# Altium PCB DRIVER.PcbDoc (part 1 of 5)
Units mm, origin at the board's own origin, x right, y up, seen from the top; angles counter-clockwise.
Board outline 130 x 51 mm, 4 copper layers (SIG, GND_SIG, PWR, GND_PWR), stack 1.544 mm thick; 199 components, 147 nets, 682 pads, 359 vias.
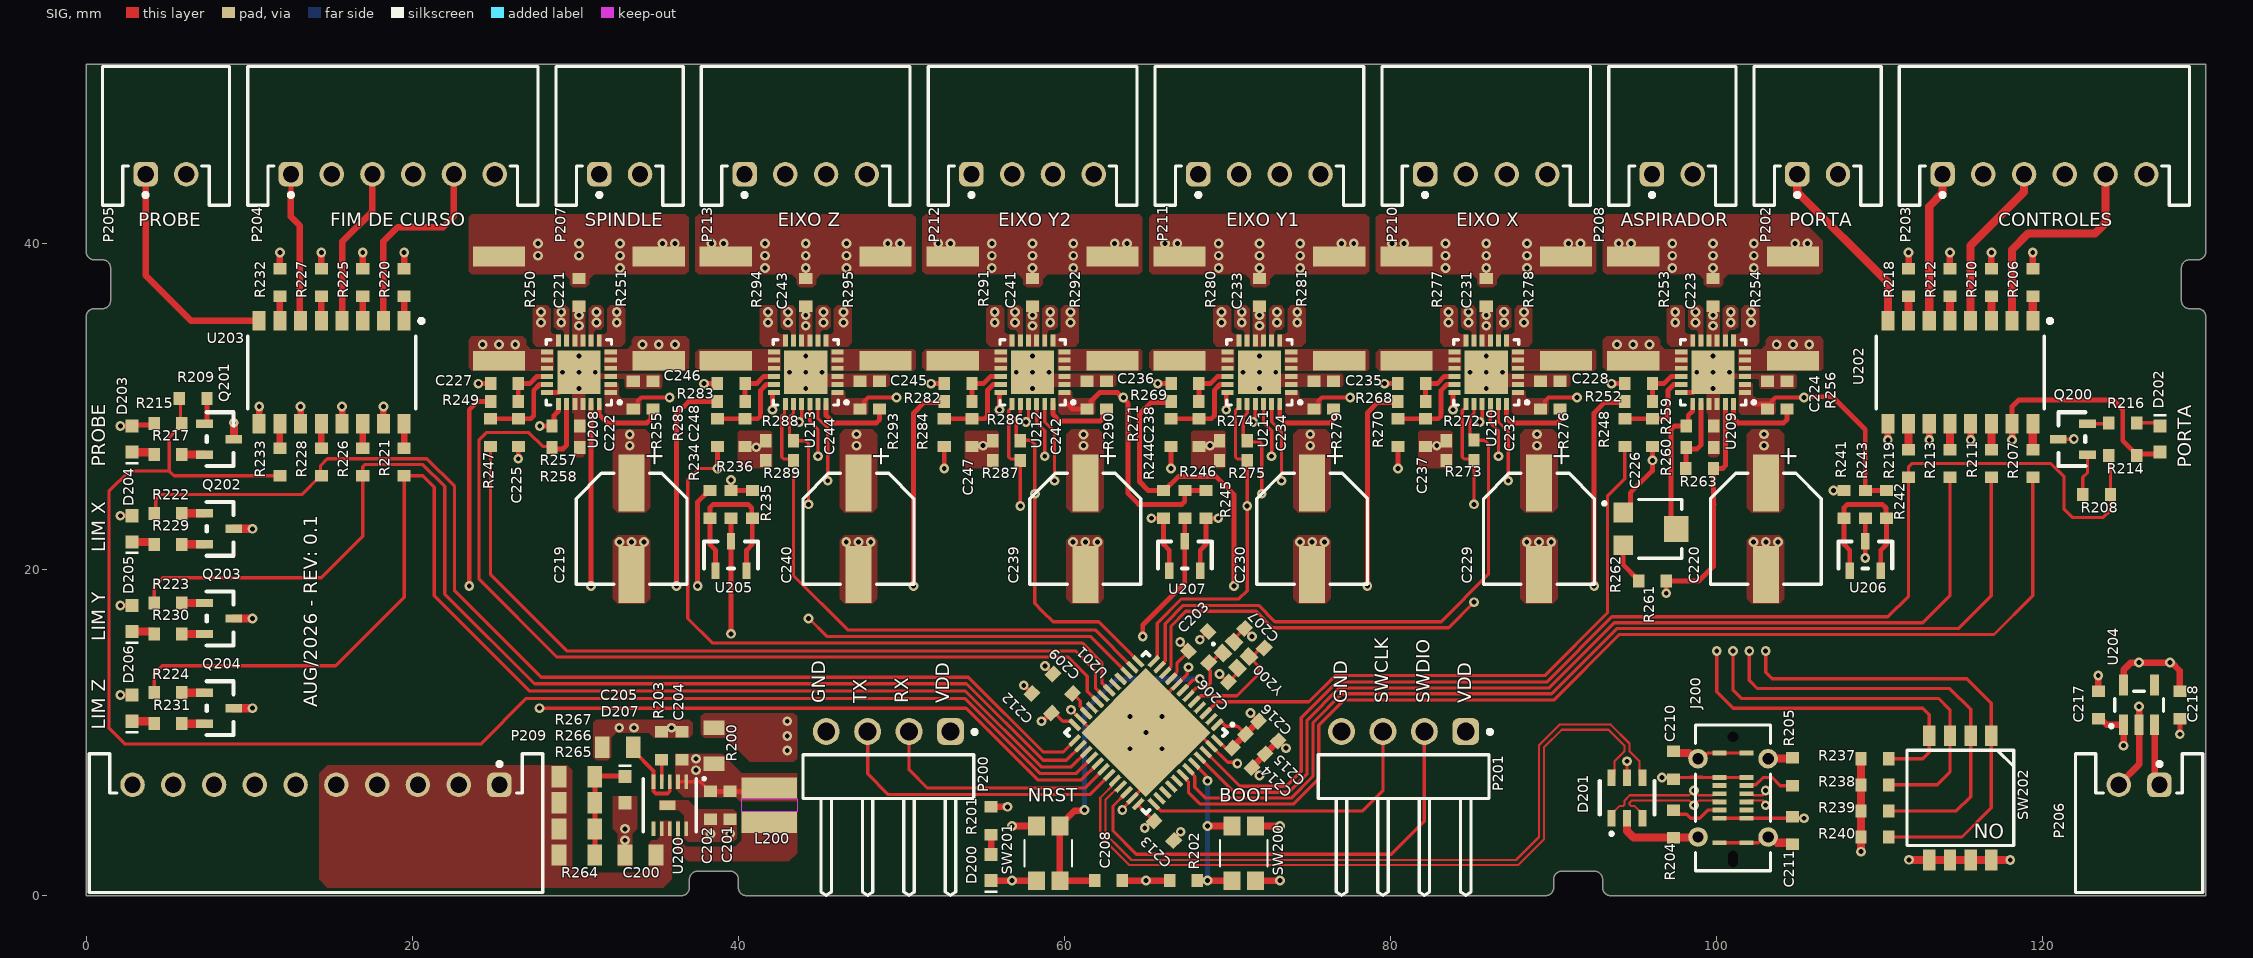
[diagram p0: SIG view]
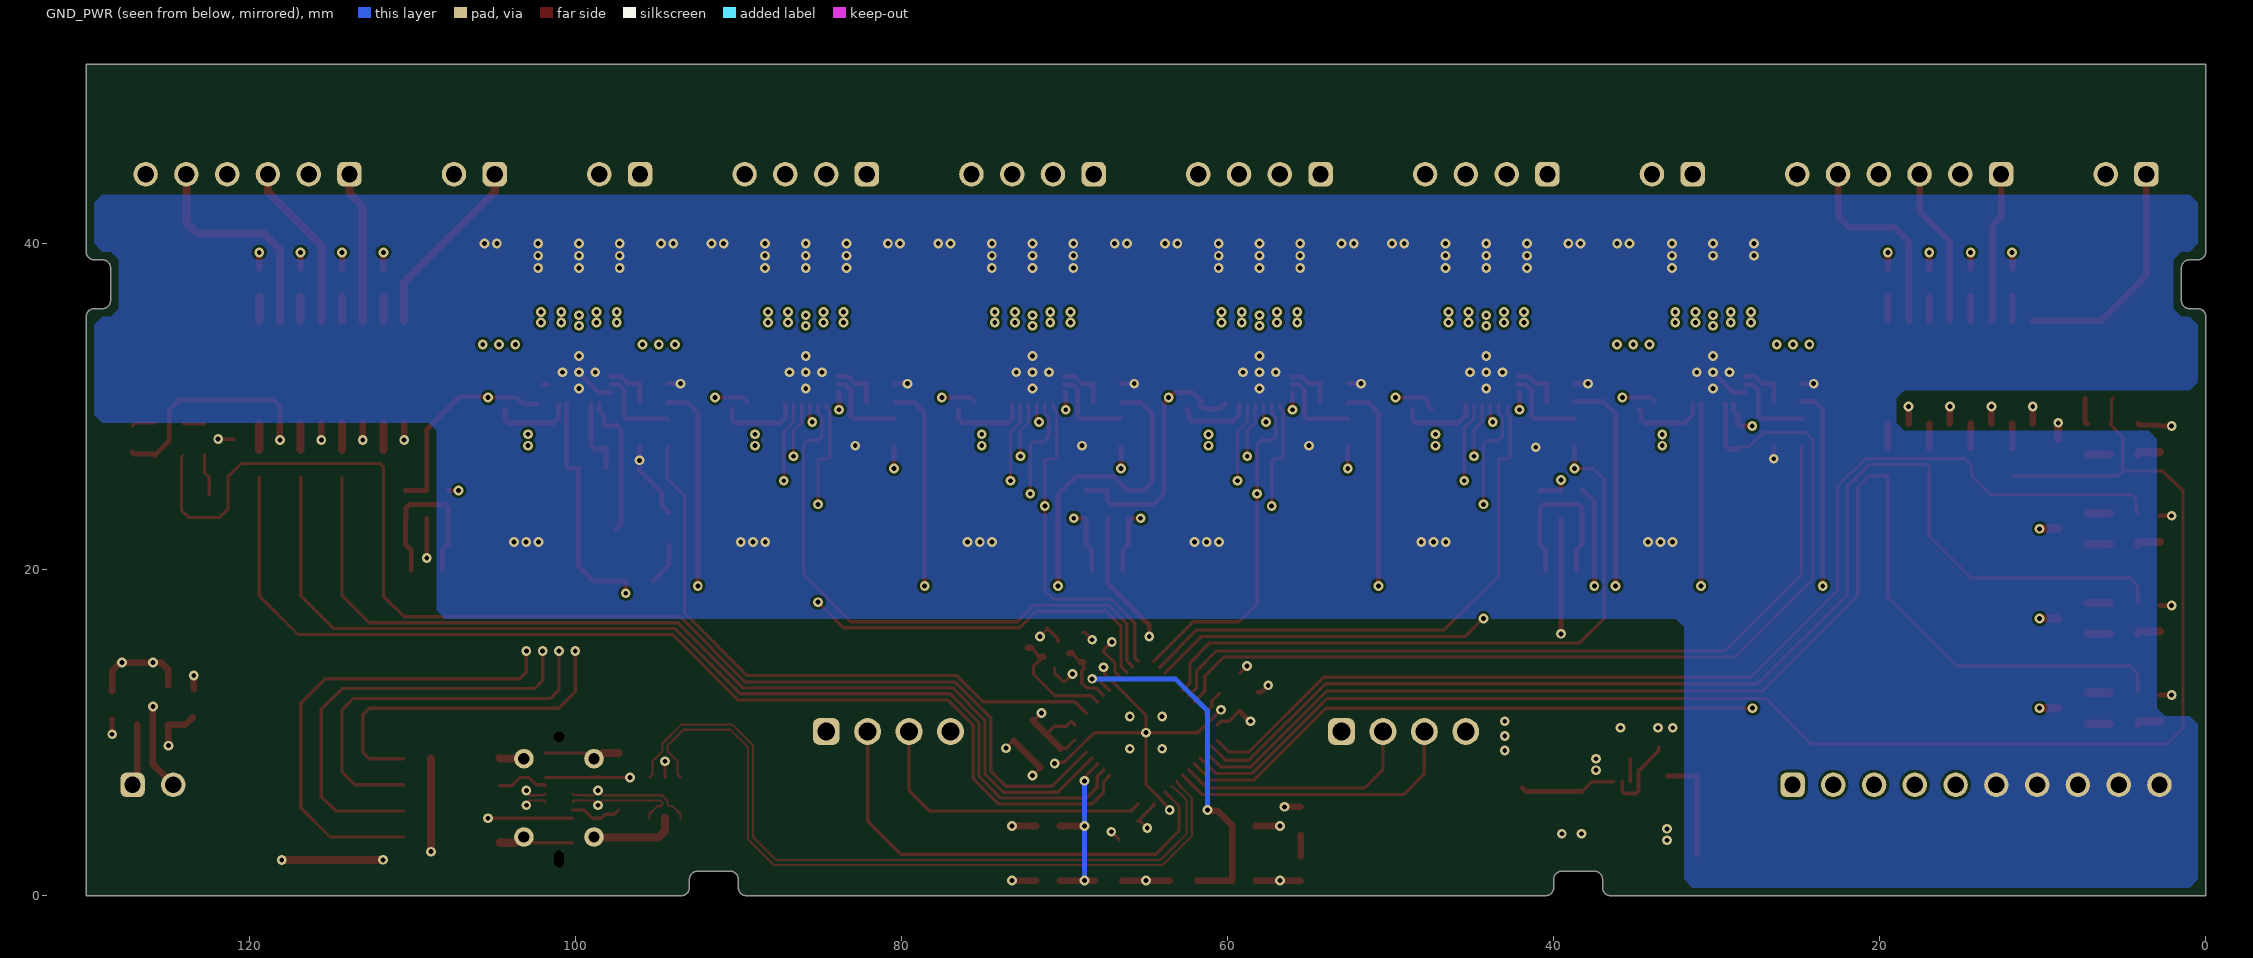
[diagram p1: GND_PWR view, seen from below]
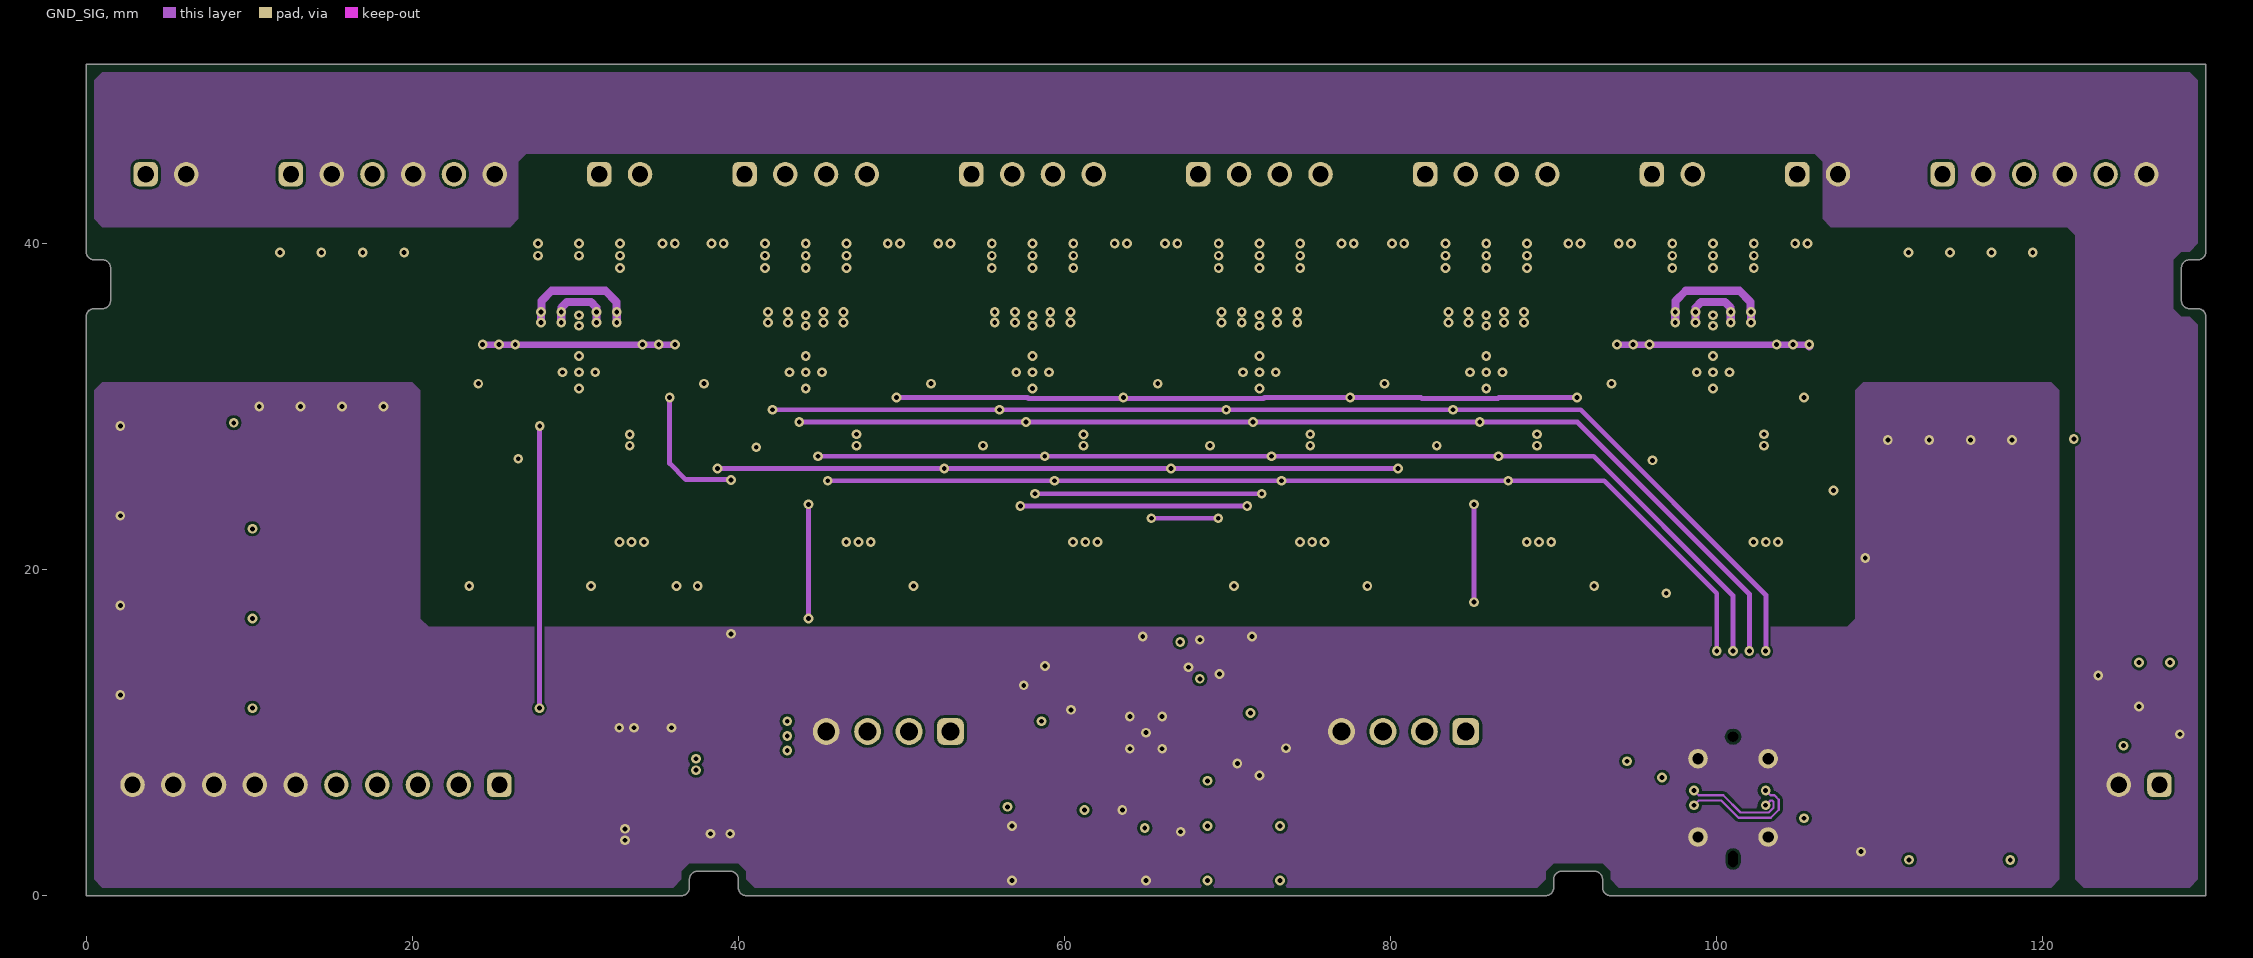
[diagram p2: GND_SIG]
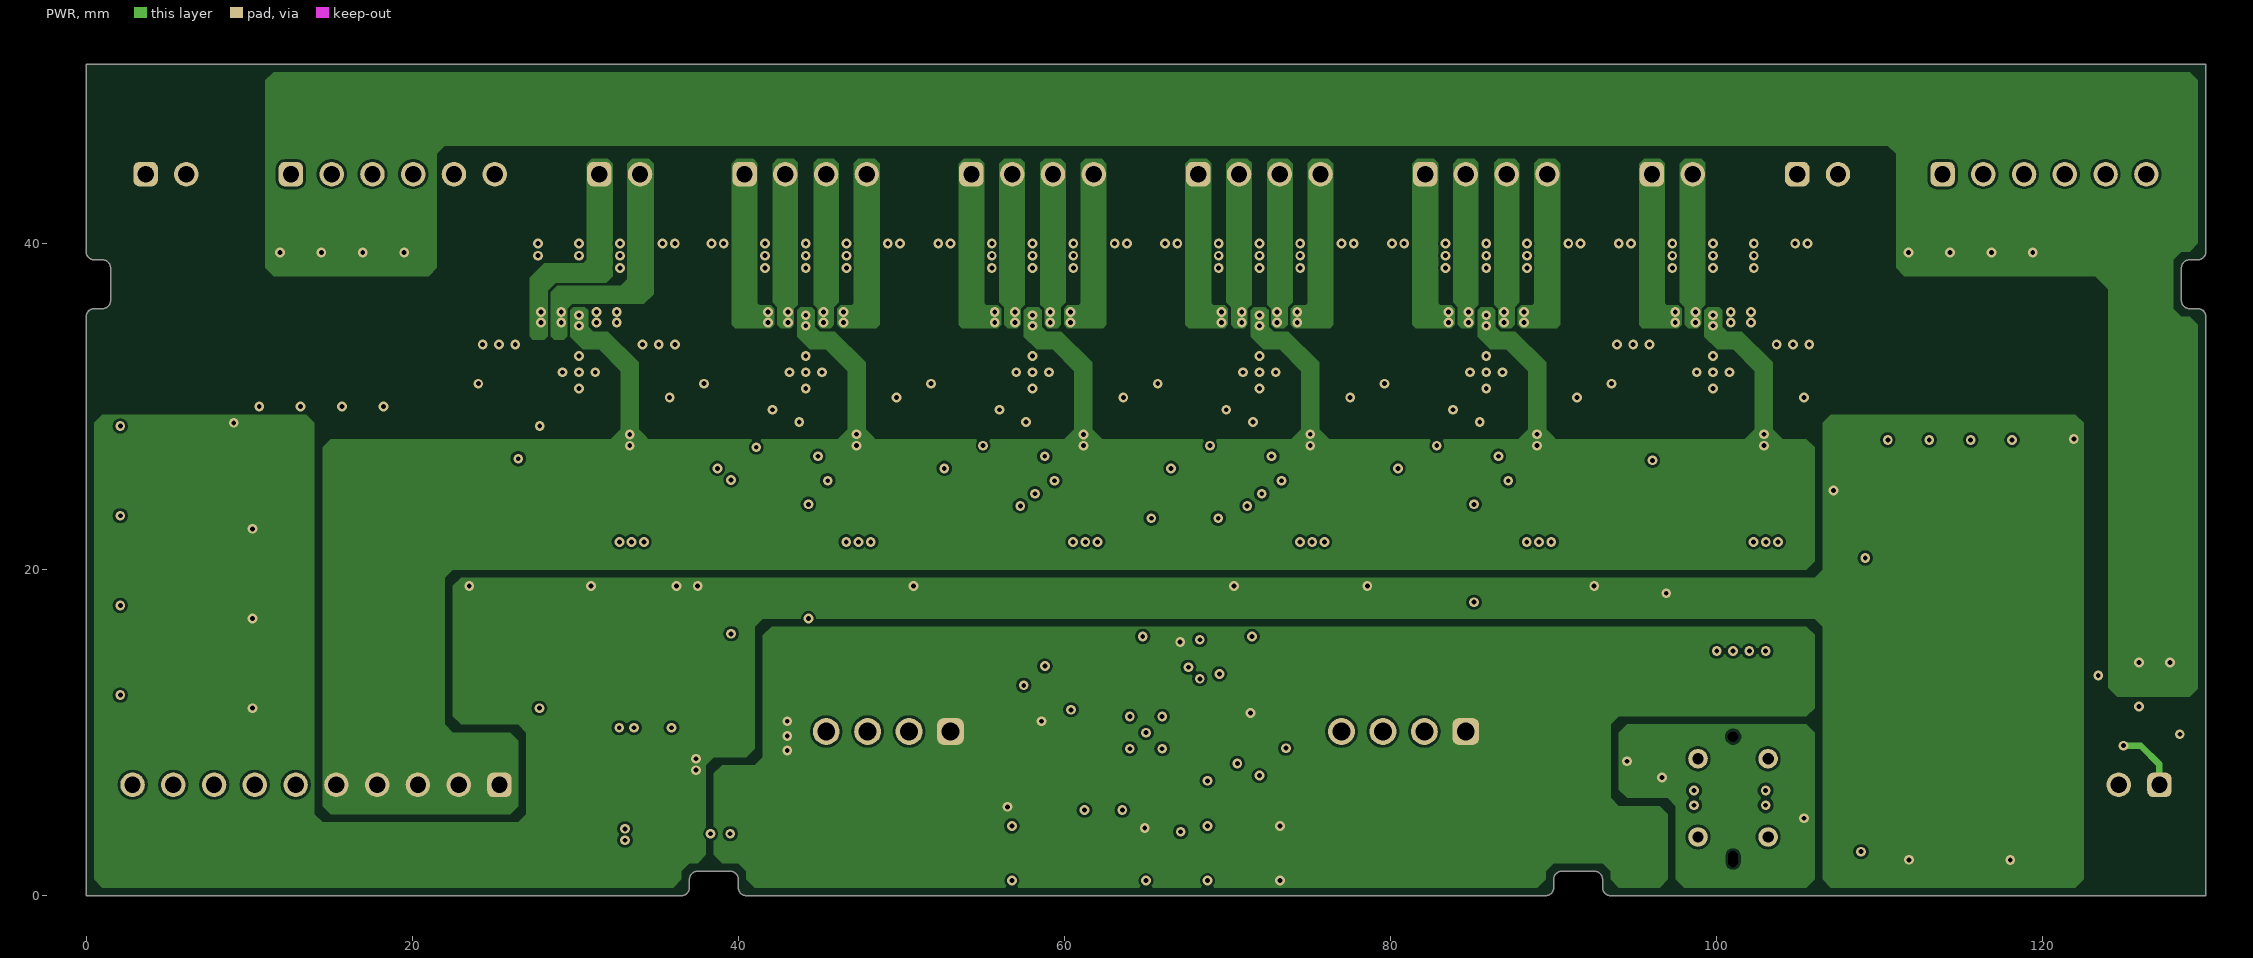
[diagram p3: PWR]
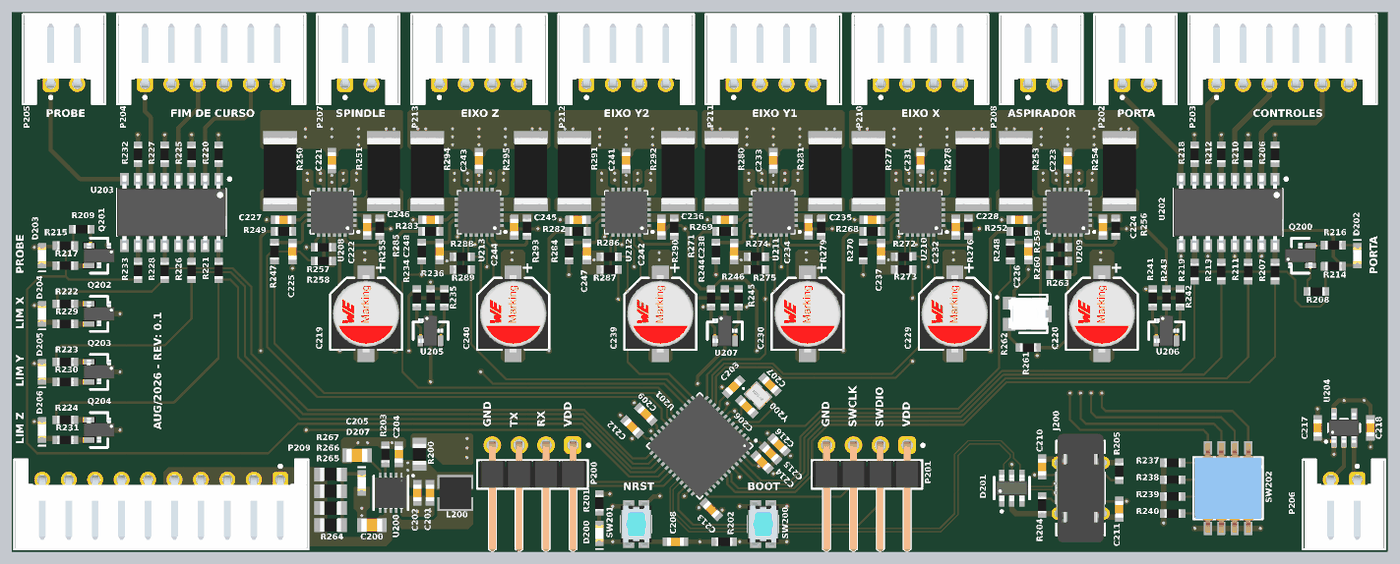
[diagram p6: 3D render of the assembled board from above, using the file's embedded part models]

## Layer stack, top to bottom
Top Solder: solder mask 0.01, Solder Resist, Dk 3.5
SIG: signal copper 0.035
Dielectric 2: prepreg 0.092, PP-006, Dk 4.1
GND_SIG: signal copper 0.03
Dielectric 1: dielectric 1.23, FR-4, Dk 4.8
PWR: signal copper 0.03
Dielectric 3: prepreg 0.092, PP-006, Dk 4.1
GND_PWR: signal copper 0.035
Bottom Solder: solder mask 0.01, Solder Resist, Dk 3.5

## Board outline
0,0 36.5,0 ccw(c36.5,0.5) 37,0.5 37,1 cw(c37.5,1) 37.5,1.5 39.5,1.5 cw(c39.5,1) 40,1 40,0.5 ccw(c40.5,0.5) 40.5,0 89.5,0 ccw(c89.5,0.5) 90,0.5 90,1 cw(c90.5,1) 90.5,1.5 92.5,1.5 cw(c92.5,1) 93,1 93,0.5 ccw(c93.5,0.5) 93.5,0 130,0 130,35.5 ccw(c129.5,35.5) 129.5,36 129,36 cw(c129,36.5) 128.5,36.5 128.5,38.5 cw(c129,38.5) 129,39 129.5,39 ccw(c129.5,39.5) 130,39.5 130,51 0,51 0,39.5 ccw(c0.5,39.5) 0.5,39 1,39 cw(c1,38.5) 1.5,38.5 1.5,36.5 cw(c1,36.5) 1,36 0.5,36 ccw(c0.5,35.5) 0,35.5

## Design rules (kind name [scope] priority, off if disabled: settings)
Clearance Clearance_DIFF90 [InNetClass('Diff. Pair')] p1: gap=0.178 ignorepadtopadclearanceinfootprint=FALSE
Clearance [All] p2: gap=0.16 ignorepadtopadclearanceinfootprint=FALSE
DiffPairsRouting DIFF90 [InDifferentialPairClass('DIFF90')] p1: maxlimit=0.178 minlimit=0.178 mostfreqgap=0.178 toplayer_minwidth=0.136 toplayer_maxwidth=0.136 toplayer_prefwidth=0.136 midlayer1_minwidth=0.136 midlayer1_maxwidth=0.136 midlayer1_prefwidth=0.136 midlayer2_minwidth=0.136 midlayer2_maxwidth=0.136 midlayer2_prefwidth=0.136 bottomlayer_minwidth=0.136 bottomlayer_maxwidth=0.136 bottomlayer_prefwidth=0.136 maxuncoupledlength=12.7
DiffPairsRouting [All] p2: maxlimit=0.254 minlimit=0.254 mostfreqgap=0.254 toplayer_minwidth=0.381 toplayer_maxwidth=0.381 toplayer_prefwidth=0.381 midlayer1_minwidth=0.381 midlayer1_maxwidth=0.381 midlayer1_prefwidth=0.381 midlayer2_minwidth=0.381 midlayer2_maxwidth=0.381 midlayer2_prefwidth=0.381 bottomlayer_minwidth=0.381 bottomlayer_maxwidth=0.381 bottomlayer_prefwidth=0.381 maxuncoupledlength=12.7
HoleSize [All] p1: absolutevalues=TRUE maxlimit=3 minlimit=0.025 maxpercent=80.000 minpercent=20.000
MinimumSolderMaskSliver [All] p1: minsoldermaskwidth=0.15
PolygonConnect [All] p1: connectstyle=Direct reliefconductorwidth=0.254 reliefentries=4 polygonreliefangle="90 Angle" airgapwidth=0.254
RoutingVias [All] p1: holewidth=0.3 width=0.6 viastyle="Through Hole" minholewidth=0.3 minwidth=0.6 maxholewidth=0.3 maxwidth=0.6
SilkToSolderMaskClearance [IsPad] p1: minsilkscreentomaskgap=0.15 clearancetoexposedcopper=TRUE
SolderMaskExpansion [All] p1: expansion=0 istentingtop=FALSE
SupplyNets "Schematic Supply Nets_12" [InNet('+VREF_SP')] p1: voltage=0.000
SupplyNets "Schematic Supply Nets_11" [InNet('+VREF_VAC')] p2: voltage=0.000
SupplyNets "Schematic Supply Nets_10" [InNet('+3V3')] p3: voltage=0.000
SupplyNets "Schematic Supply Nets_9" [InNet('GND_ISO')] p4: voltage=0.000
SupplyNets "Schematic Supply Nets_8" [InNet('+24V_PSU')] p5: voltage=0.000
SupplyNets "Schematic Supply Nets_6" [InNet('+3V3_ISO')] p6: voltage=0.000
SupplyNets "Schematic Supply Nets_5" [InNet('+VDD_MCU')] p7: voltage=0.000
SupplyNets "Schematic Supply Nets_4" [InNet('GND')] p8: voltage=0.000
SupplyNets "Schematic Supply Nets_3" [InNet('+VBUS')] p9: voltage=0.000
SupplyNets "Schematic Supply Nets_1" [InNet('+5V_ISO')] p10: voltage=0.000
SupplyNets "Schematic Supply Nets" [InNet('+VREF_STPR')] p11: voltage=0.000
Width Width_DIFF90 [InNetClass('Diff. Pair')] p1: maxlimit=0.136 minlimit=0.136 preferedwidth=0.136
Width [All] p2: maxlimit=1.27 minlimit=0.127 preferedwidth=0.254
26 further rules are at their usual default settings.

## Classes and differential pairs
net class "Diff. Pair": USBCON_N USBCON_P USBMIC_N USBMIC_P
differential pair class DIFF90: USBCON USBMIC
component class 5_MOTORES_DE_PASSO: C229 C230 C231 C232 C233 C234 C235 C236 C237 C238 C239 C240 C241 C242 C243 C244 C245 C246 C247 C248 HS202 HS203 HS204 HS205 P210 P211 P212 P213 R268 R269 R270 R271 R272 R273 R274 R275 R276 R277 R278 R279 R280 R281 R282 R283 R284 R285 R286 R287 R288 R289 R290 R291 R292 R293 R294 R295 U210 U211 U212 U213
component class 4_MOTORES_DC: C219 C220 C221 C222 C223 C224 C225 C226 C227 C228 D207 HS200 HS201 HS206 P207 P208 P209 R247 R248 R249 R250 R251 R252 R253 R254 R255 R256 R257 R258 R259 R260 R261 R262 R263 R264 R265 R266 R267 U208 U209
component class 3_INTERFACE_DOS_DRIVERS: R234 R235 R236 R237 R238 R239 R240 R241 R242 R243 R244 R245 R246 SW202 U205 U206 U207
component class 2_INTERFACES_EXTERNAS: C217 C218 D202 D203 D204 D205 D206 P202 P203 P204 P205 P206 Q200 Q201 Q202 Q203 Q204 R206 R207 R208 R209 R210 R211 R212 R213 R214 R215 R216 R217 R218 R219 R220 R221 R222 R223 R224 R225 R226 R227 R228 R229 R230 R231 R232 R233 U202 U203 U204
component class 1_MICROCONTROLADOR: C200 C201 C202 C203 C204 C205 C206 C207 C208 C209 C210 C211 C212 C213 C214 C215 C216 D200 D201 J200 L200 P200 P201 R200 R201 R202 R203 R204 R205 SW200 SW201 U200 U201 Y200
differential pair USBMIC: +USBMIC_P -USBMIC_N
differential pair USBCON: +USBCON_P -USBCON_N

## Components (designator, comment, footprint, x,y, rotation, side; value= is the part's Value field where it differs from the comment)
C200 "1μF, 50V" WCAP-CSGP_0805_L2W1.25H1.25 34,2.5 r0 top
C201 "2.2μF, 16V" WCAP-CSGP_0603_L1.6W0.8H0.8_Wave 39.5,5.548 r90 top
C202 "330nF, 16V" WCAP-CSGP_0603_L1.6W0.8H0.8_Wave 38.3,5.548 r90 top
C203 "100nF, 16V" WCAP-CSGP_0603_L1.6W0.8H0.8_Wave 68.2,15.6 r225 top
C204 "100nF, 16V" WCAP-CSGP_0603_L1.6W0.8H0.8_Wave 36.55,9.2 r270 top
C205 "470nF, 50V" WCAP-CSGP_0805_L2W1.25H1.25 32.6,9.1 r0 top
C206 "10pF, 16V" WCAP-CSGP_0603_L1.6W0.8H0.8_Wave 69.449,13.703 r135 top
C207 "10pF, 16V" WCAP-CSGP_0603_L1.6W0.8H0.8_Wave 71.649,15.794 r315 top
C208 "100nF, 16V" WCAP-CSGP_0603_L1.6W0.8H0.8_Wave 62.7,0.925 r180 top
C209 "2.2μF, 16V" WCAP-CSGP_0603_L1.6W0.8H0.8_Wave 59.9,13 r315 top
C210 "2.2μF, 16V" WCAP-CSGP_0603_L1.6W0.8H0.8_Wave 97.35,8 r270 top
C211 "2.2μF, 16V" WCAP-CSGP_0603_L1.6W0.8H0.8_Wave 104.65,4 r90 top
C212 "100nF, 16V" WCAP-CSGP_0603_L1.6W0.8H0.8_Wave 58.6,11.8 r315 top
C213 "100nF, 16V" WCAP-CSGP_0603_L1.6W0.8H0.8_Wave 66.1,3.975 r135 top
C214 "100nF, 16V" WCAP-CSGP_0603_L1.6W0.8H0.8_Wave 70.9,8.459 r135 top
C215 "100nF, 16V" WCAP-CSGP_0603_L1.6W0.8H0.8_Wave 71.7,9.3 r135 top
C216 "2.2μF, 16V" WCAP-CSGP_0603_L1.6W0.8H0.8_Wave 72.5,10.1 r135 top
C217 "1μF, 16V" WCAP-CSGP_0603_L1.6W0.8H0.8_Wave 123.4,11.7 r270 top
C218 "1μF, 16V" WCAP-CSGP_0603_L1.6W0.8H0.8_Wave 128.4,11.7 r90 top
C219 "47μF, 50V" WCAP-ASLI_D6.3H7.7 33.456,22.5 r90 top
C220 "47μF, 50V" WCAP-ASLI_D6.3H7.7 103.011,22.5 r90 top
C221 "330nF, 50V" WCAP-CSGP_0603_L1.6W0.8H0.8_Wave 30.222,37 r270 top
C222 "330nF, 16V" WCAP-CSGP_0603_L1.6W0.8H0.8_Wave 33.556,30.7 r270 top
C223 "330nF, 50V" WCAP-CSGP_0603_L1.6W0.8H0.8_Wave 99.777,37 r270 top
C224 "330nF, 16V" WCAP-CSGP_0603_L1.6W0.8H0.8_Wave 103.111,30.7 r270 top
C225 "10nF, 16V" WCAP-CSGP_0603_L1.6W0.8H0.8_Wave 26.506,28.4 r90 top
C226 "10nF, 16V" WCAP-CSGP_0603_L1.6W0.8H0.8_Wave 96.061,28.4 r90 top
C227 "1nF, 16V" WCAP-CSGP_0603_L1.6W0.8H0.8_Wave 25.656,31.4 r0 top
C228 "1nF, 16V" WCAP-CSGP_0603_L1.6W0.8H0.8_Wave 95.211,31.4 r0 top
C229 "47μF, 50V" WCAP-ASLI_D6.3H7.7 89.1,22.5 r90 top
C230 "47μF, 50V" WCAP-ASLI_D6.3H7.7 75.189,22.5 r90 top
C231 "330nF, 50V" WCAP-CSGP_0603_L1.6W0.8H0.8_Wave 85.866,37 r270 top
C232 "330nF, 16V" WCAP-CSGP_0603_L1.6W0.8H0.8_Wave 89.2,30.7 r270 top
C233 "330nF, 50V" WCAP-CSGP_0603_L1.6W0.8H0.8_Wave 71.955,37 r270 top
C234 "330nF, 16V" WCAP-CSGP_0603_L1.6W0.8H0.8_Wave 75.289,30.7 r270 top
C235 "1nF, 16V" WCAP-CSGP_0603_L1.6W0.8H0.8_Wave 81.3,31.4 r0 top
C236 "1nF, 16V" WCAP-CSGP_0603_L1.6W0.8H0.8_Wave 67.389,31.4 r0 top
C237 "10nF, 16V" WCAP-CSGP_0603_L1.6W0.8H0.8_Wave 82.15,28.4 r90 top
C238 "10nF, 16V" WCAP-CSGP_0603_L1.6W0.8H0.8_Wave 68.239,28.4 r90 top
C239 "47μF, 50V" WCAP-ASLI_D6.3H7.7 61.278,22.5 r90 top
C240 "47μF, 50V" WCAP-ASLI_D6.3H7.7 47.367,22.5 r90 top
C241 "330nF, 50V" WCAP-CSGP_0603_L1.6W0.8H0.8_Wave 58.044,37 r270 top
C242 "330nF, 16V" WCAP-CSGP_0603_L1.6W0.8H0.8_Wave 61.378,30.7 r270 top
C243 "330nF, 50V" WCAP-CSGP_0603_L1.6W0.8H0.8_Wave 44.133,37 r270 top
C244 "330nF, 16V" WCAP-CSGP_0603_L1.6W0.8H0.8_Wave 47.467,30.7 r270 top
C245 "1nF, 16V" WCAP-CSGP_0603_L1.6W0.8H0.8_Wave 53.478,31.4 r0 top
C246 "1nF, 16V" WCAP-CSGP_0603_L1.6W0.8H0.8_Wave 39.567,31.4 r0 top
C247 "10nF, 16V" WCAP-CSGP_0603_L1.6W0.8H0.8_Wave 54.328,28.4 r90 top
C248 "10nF, 16V" WCAP-CSGP_0603_L1.6W0.8H0.8_Wave 40.417,28.4 r90 top
D200 "Bright Green, 2V, 140deg" WL-SMCW_0603_150060xx75000 55.5,1.725 r90 top
D201 "USBLC6-2SC6Y" SOT-23-6 94.5,6 r90 top value=2.5pF
D202 "Red, 2V, 140deg" WL-SMCW_0603_150060xx75003 127.174,28 r270 top
D203 "Red, 2V, 140deg" WL-SMCW_0603_150060xx75003 2.826,28 r90 top
D204 "Red, 2V, 140deg" WL-SMCW_0603_150060xx75003 2.826,22.5 r90 top
D205 "Red, 2V, 140deg" WL-SMCW_0603_150060xx75003 2.826,17 r90 top
D206 "Red, 2V, 140deg" WL-SMCW_0603_150060xx75003 2.826,11.5 r90 top
D207 "Red, 2V, 140deg" WL-SMCW_0603_150060xx75003 33.05,6.5 r270 top
HS200 "10x10x7mm" HEATSINK_10MM_10MM_7MM 44.133,63 r0 top
HS201 "10x10x7mm" HEATSINK_10MM_10MM_7MM 58.044,63 r0 top
HS202 "10x10x7mm" HEATSINK_10MM_10MM_7MM 30.222,63 r0 top
HS203 "10x10x7mm" HEATSINK_10MM_10MM_7MM 71.955,63 r0 top
HS204 "10x10x7mm" HEATSINK_10MM_10MM_7MM 85.866,63 r0 top
HS205 "10x10x7mm" HEATSINK_10MM_10MM_7MM 99.777,63 r0 top
HS206 "70x21x4mm" HEATSINK_70MM_21MM_4MM 65,81 r180 top
J200 "629722050114" 629722050114 101,6 r270 top
L200 "47uH" WE-MAIA_3015 41.9,5.548 r90 top
P200 "61300411021" 61300411021 49.2,7.3 r0 top
P201 "61300411021" 61300411021 80.8,7.3 r0 top
P202 "68800211722" 68800211722 106.188,46.6 r180 top
P203 "68800611722" 68800611722 120.099,46.6 r180 top
P204 "68800611722" 68800611722 18.811,46.6 r180 top
P205 "68800211722" 68800211722 4.9,46.6 r180 top
P206 "68800211722" 68800211722 125.9,4.45 r0 top locked
P207 "68800211722" 68800211722 32.722,46.6 r180 top
P208 "68800211722" 68800211722 97.277,46.6 r180 top
P209 "68801011722" 68801011722 14.1,4.45 r0 top locked
P210 "68800411722" 68800411722 85.866,46.6 r180 top
P211 "68800411722" 68800411722 71.955,46.6 r180 top
P212 "68800411722" 68800411722 58.044,46.6 r180 top
P213 "68800411722" 68800411722 44.133,46.6 r180 top
Q200 "SBC817-40LT3G" SOT-23-3 121.774,28 r90 top
Q201 "SBC817-40LT3G" SOT-23-3 8.226,28 r270 top
Q202 "SBC817-40LT3G" SOT-23-3 8.226,22.5 r270 top
Q203 "SBC817-40LT3G" SOT-23-3 8.226,17 r270 top
Q204 "SBC817-40LT3G" SOT-23-3 8.226,11.5 r270 top
R200 "0Ω" 0805-WAVE 38.5,9.2 r90 top
R201 "200Ω" 0603-WAVE#1 55.5,4.6 r90 top
R202 "10kΩ" 0603-WAVE#1 67.3,0.925 r0 top
R203 "0Ω" 0603-WAVE#1 35.3,9.2 r90 top
R204 "5.11kΩ" 0603-WAVE#1 97.35,4.4 r90 top
R205 "5.11kΩ" 0603-WAVE#1 104.65,7.6 r270 top
R206 "205Ω" 0603-WAVE#1 119.383,37.6 r270 top
R207 "10kΩ" 0603-WAVE#1 119.383,26.5 r270 top
R208 "17.8kΩ" 0603-WAVE#1 123.3,24.6 r0 top
R209 "17.8kΩ" 0603-WAVE#1 6.568,30.5 r180 top
R210 "205Ω" 0603-WAVE#1 116.843,37.6 r270 top
R211 "10kΩ" 0603-WAVE#1 116.843,26.5 r270 top
R212 "205Ω" 0603-WAVE#1 114.303,37.6 r270 top
R213 "10kΩ" 0603-WAVE#1 114.303,26.5 r270 top
R214 "10kΩ" 0603-WAVE#1 124.9,27 r180 top
R215 "NM" 0603-WAVE#1 5.026,28.95 r0 top
R216 "205Ω" 0603-WAVE#1 124.9,29 r180 top
R217 "205Ω" 0603-WAVE#1 5.026,27.05 r0 top
R218 "205Ω" 0603-WAVE#1 111.763,37.6 r270 top
R219 "10kΩ" 0603-WAVE#1 111.763,26.5 r270 top
R220 "205Ω" 0603-WAVE#1 19.507,37.6 r270 top
R221 "10kΩ" 0603-WAVE#1 19.507,26.6 r270 top
R222 "17.8kΩ" 0603-WAVE#1 5.026,23.45 r180 top
R223 "17.8kΩ" 0603-WAVE#1 5.026,17.95 r180 top
R224 "17.8kΩ" 0603-WAVE#1 5.026,12.45 r180 top
R225 "205Ω" 0603-WAVE#1 16.967,37.6 r270 top
R226 "10kΩ" 0603-WAVE#1 16.967,26.6 r270 top
R227 "205Ω" 0603-WAVE#1 14.427,37.6 r270 top
R228 "10kΩ" 0603-WAVE#1 14.427,26.6 r270 top
R229 "205Ω" 0603-WAVE#1 5.026,21.55 r0 top
R230 "205Ω" 0603-WAVE#1 5.026,16.05 r0 top
R231 "205Ω" 0603-WAVE#1 5.026,10.55 r0 top
R232 "205Ω" 0603-WAVE#1 11.887,37.6 r270 top
R233 "10kΩ" 0603-WAVE#1 11.887,26.6 r270 top
R234 "100Ω" 0603-WAVE#1 38.256,24 r90 top
R235 "1.78kΩ" 0603-WAVE#1 40.856,24 r90 top
R236 "909Ω" 0603-WAVE#1 39.556,24 r270 top
R237 "10kΩ" 0603-WAVE#1 109.7,8.4 r0 top
R238 "10kΩ" 0603-WAVE#1 109.7,6.8 r0 top
R239 "10kΩ" 0603-WAVE#1 109.7,5.2 r0 top
R240 "10kΩ" 0603-WAVE#1 109.7,3.6 r0 top
R241 "100Ω" 0603-WAVE#1 107.811,24 r90 top
R242 "1.78kΩ" 0603-WAVE#1 110.411,24 r90 top
R243 "909Ω" 0603-WAVE#1 109.111,24 r270 top
R244 "100Ω" 0603-WAVE#1 66.078,24 r90 top
R245 "1.78kΩ" 0603-WAVE#1 68.678,24 r90 top
R246 "909Ω" 0603-WAVE#1 67.378,24 r270 top
R247 "39.2kΩ" 0603-WAVE#1 24.806,28.4 r270 top
R248 "39.2kΩ" 0603-WAVE#1 94.361,28.4 r270 top
R249 "18.2kΩ" 0603-WAVE#1 25.656,30.3 r180 top
R250 "0.2Ω, 1W" 2512-WAVE 25.322,36 r270 top value=200mΩ
R251 "0.2Ω, 1W" 2512-WAVE 35.122,36 r270 top value=200mΩ
R252 "18.2kΩ" 0603-WAVE#1 95.211,30.3 r180 top
R253 "0.2Ω, 1W" 2512-WAVE 94.877,36 r270 top value=200mΩ
R254 "0.2Ω, 1W" 2512-WAVE 104.677,36 r270 top value=200mΩ
R255 "39.2kΩ" 0603-WAVE#1 34.756,30.7 r270 top
R256 "39.2kΩ" 0603-WAVE#1 104.311,30.7 r270 top
R257 "47.5kΩ" 0603-WAVE#1 29.422,28.8 r180 top
R258 "47.5kΩ" 0603-WAVE#1 29.422,27.5 r180 top
R259 "47.5kΩ" 0603-WAVE#1 98.977,28.8 r180 top
R260 "47.5kΩ" 0603-WAVE#1 98.977,27.5 r180 top
R261 "1kΩ" 0603-WAVE#1 96.056,19.3 r180 top
R262 "10kΩ, 0.15W" TRIM-3P80MM_3P60MM 96.056,22.5 r0 top value=10kΩ
R263 "NM" 0603-WAVE#1 98.95,26.2 r180 top
R264 "8.87kΩ" 0805-WAVE 30.1,2.5 r180 top
R265 "8.87kΩ" 0805-WAVE 30.1,4.1 r180 top
R266 "8.87kΩ" 0805-WAVE 30.1,5.7 r180 top
R267 "8.87kΩ" 0805-WAVE 30.1,7.3 r180 top
R268 "1kΩ" 0603-WAVE#1 81.3,30.3 r180 top
R269 "1kΩ" 0603-WAVE#1 67.389,30.3 r180 top
R270 "10kΩ" 0603-WAVE#1 80.45,28.4 r270 top
R271 "10kΩ" 0603-WAVE#1 66.539,28.4 r270 top
R272 "47.5kΩ" 0603-WAVE#2 84.266,27.9 r0 top
R273 "47.5kΩ" 0603-WAVE#1 84.266,26.7 r0 top
R274 "47.5kΩ" 0603-WAVE#1 70.355,27.9 r0 top
R275 "47.5kΩ" 0603-WAVE#1 70.355,26.7 r0 top
R276 "22.1kΩ" 0603-WAVE#1 90.4,30.7 r270 top
R277 "0.2Ω, 1W" 2512-WAVE 80.966,36 r270 top value=200mΩ
R278 "0.2Ω, 1W" 2512-WAVE 90.766,36 r270 top value=200mΩ
R279 "22.1kΩ" 0603-WAVE#1 76.489,30.7 r270 top
R280 "0.2Ω, 1W" 2512-WAVE 67.055,36 r270 top value=200mΩ
R281 "0.2Ω, 1W" 2512-WAVE 76.855,36 r270 top value=200mΩ
R282 "1kΩ" 0603-WAVE#1 53.478,30.3 r180 top
R283 "1kΩ" 0603-WAVE#1 39.567,30.3 r180 top
R284 "10kΩ" 0603-WAVE#1 52.628,28.4 r270 top
R285 "10kΩ" 0603-WAVE#1 38.717,28.4 r270 top
R286 "47.5kΩ" 0603-WAVE#1 56.444,27.9 r0 top
R287 "47.5kΩ" 0603-WAVE#1 56.444,26.7 r0 top
R288 "47.5kΩ" 0603-WAVE#1 42.533,27.9 r0 top
R289 "47.5kΩ" 0603-WAVE#1 42.533,26.7 r0 top
R290 "22.1kΩ" 0603-WAVE#1 62.578,30.7 r270 top
R291 "0.2Ω, 1W" 2512-WAVE 53.144,36 r270 top value=200mΩ
R292 "0.2Ω, 1W" 2512-WAVE 62.944,36 r270 top value=200mΩ
R293 "22.1kΩ" 0603-WAVE#1 48.667,30.7 r270 top
R294 "0.2Ω, 1W" 2512-WAVE 39.233,36 r270 top value=200mΩ
R295 "0.2Ω, 1W" 2512-WAVE 49.033,36 r270 top value=200mΩ
SW200 "434153017835" 434153017835 71,2.6 r270 top
SW201 "434153017835" 434153017835 59,2.6 r90 top
SW202 "416131160804" 416131160804 114.938,6 r180 top
U200 "L7983PU33R" 10-WFDFN-EP 35.8,5.548 r270 top
U201 "STM32F411CEU6" UFQFN-48-7X7_EXPOSED_PAD 65,10 r225 top locked
U202 "TLP293-4" SO-16 114.938,32.1 r270 top
U203 "TLP293-4" SO-16 15.062,32.1 r270 top
U204 "LDK220M33R" SOT-23-5 125.9,11.7 r90 top
U205 "TS3431CILT" SOT-23-3 39.556,20.9 r0 top
U206 "TS3431CILT" SOT-23-3 109.111,20.9 r0 top
U207 "TS3431CILT" SOT-23-3 67.378,20.9 r0 top
U208 "STSPIN840" 24-TQFPN 30.222,32.1 r180 top
U209 "STSPIN840" 24-TQFPN 99.777,32.1 r180 top
U210 "STSPIN820" 24-TQFPN 85.866,32.1 r180 top
U211 "STSPIN820" 24-TQFPN 71.955,32.1 r180 top
U212 "STSPIN820" 24-TQFPN 58.044,32.1 r180 top
U213 "STSPIN820" 24-TQFPN 44.133,32.1 r180 top
Y200 "25MHz" WE-XTAL_IQXC-42 70.508,14.765 r315 top

## Footprints (in the part's own frame and the unit in brackets; to place one, negate y for a bottom-side part, rotate by r counter-clockwise, add the part's x,y. Pads: shape width x height; smd on the part's side, far side on the other; paste and mask are expansions set on the pad)
10-WFDFN-EP [mil]
  rect 35.43x9 smd paste+0 mask+0: 1(-57,39.37) 2(-57,19.68) 3(-57,0) 4(-57,-19.68) 5(-57,-39.37) 6(57,-39.37) 7(57,-19.68) 8(57,0) 9(57,19.68) 10(57,39.37)
  rect 24x39 smd paste+0 mask+0: 11(0,-5.91)
  silkscreen extent -67,-64 64,85, body extent -59,-59 59,59, height 30
24-TQFPN [mm]
  rect 0.75x0.3 smd mask+0: 1(-1.95,1.25) 2(-1.95,0.75) 3(-1.95,0.25) 4(-1.95,-0.25) 5(-1.95,-0.75) 6(-1.95,-1.25) 13(1.95,-1.25) 14(1.95,-0.75) 15(1.95,-0.25) 16(1.95,0.25) 17(1.95,0.75) 18(1.95,1.25)
  rect 0.3x0.75 smd mask+0: 7(-1.25,-1.95) 8(-0.75,-1.95) 9(-0.25,-1.95) 10(0.25,-1.95) 11(0.75,-1.95) 12(1.25,-1.95) 19(1.25,1.95) 20(0.75,1.95) 21(0.25,1.95) 22(-0.25,1.95) 23(-0.75,1.95) 24(-1.25,1.95)
  rect 2.65x2.65 smd paste-2539.97 mask+0: 25(0,0)
  silkscreen extent -2.59,-2 2,2, body extent -2,-2 2,2, height 1.1
0603-WAVE#1 [mm]
  rect 0.7x0.8 smd: 1(-0.85,0) 2(0.85,0)
  body extent -0.8,-0.4 0.8,0.4, height 0.45
0603-WAVE#2 [mm]
  rect 0.7x0.8 smd: 1(-0.85,0) 2(0.85,0.034)
  body extent -0.8,-0.4 0.8,0.4, height 0.45
0805-WAVE [mm]
  rect 0.9x1.3 smd: 1(-1.1,0) 2(1.1,0)
  body extent -1,-0.63 1,0.62, height 0.5
2512-WAVE [mm]
  rect 1.2x3.2 smd: 1(-3.2,0) 2(3.2,0)
  body extent -3.15,-1.55 3.15,1.55, height 0.55
61300411021 [mm] "Pin Header, pitch 2.54 mm, THT, Angled, single row, 4p"
  rrect50% 1.65x1.65 hole 1.1: 1(3.81,2.77)
  round 1.65 hole 1.1: 2(1.27,2.77) 3(-1.27,2.77) 4(-3.81,2.77)
  silkscreen extent -5.23,-7.27 5.42,2.87, body extent -5.08,-7.27 5.08,3.09, height 2.58
68800211722 [mm] "2.50mm ¡°J¡± Type Male Horizontal Shrouded Header, 2p"
  rrect50% 1.5x1.5 hole 1: 1(1.25,2.35)
  round 1.5 hole 1: 2(-1.25,2.35)
  silkscreen extent -3.9,-4.25 3.9,4.25, body extent -3.75,-4.15 3.75,4.15, height 4.23
68800411722 [mm] "2.50mm ¡°J¡± Type Male Horizontal Shrouded Header, 4p"
  rrect50% 1.5x1.5 hole 1: 1(3.75,2.35)
  round 1.5 hole 1: 2(1.25,2.35) 3(-1.25,2.35) 4(-3.75,2.35)
  silkscreen extent -6.4,-4.25 6.4,4.25, body extent -6.25,-4.15 6.25,4.15, height 4.23
68800611722 [mm] "2.50mm ¡°J¡± Type Male Horizontal Shrouded Header, 6p"
  rrect50% 1.5x1.5 hole 1: 1(6.25,2.35)
  round 1.5 hole 1: 2(3.75,2.35) 3(1.25,2.35) 4(-1.25,2.35) 5(-3.75,2.35) 6(-6.25,2.35)
  silkscreen extent -8.9,-4.25 8.9,4.25, body extent -8.75,-4.15 8.75,4.15, height 4.23
68801011722 [mm] "2.50mm ¡°J¡± Type Male Horizontal Shrouded Header, 10p"
  rrect50% 1.5x1.5 hole 1: 1(11.25,2.35)
  round 1.5 hole 1: 2(8.75,2.35) 3(6.25,2.35) 4(3.75,2.35) 5(1.25,2.35) 6(-1.25,2.35) 7(-3.75,2.35) 8(-6.25,2.35) 9(-8.75,2.35) 10(-11.25,2.35)
  silkscreen extent -13.9,-4.25 13.9,4.25, body extent -13.75,-4.15 13.75,4.15, height 4.23
416131160804 [mm] "SMD Dip Switch, Small Compact, Raised Actuator, 4pin"
  rect 0.76x1.27 smd: 1(-1.905,-3.81) 2(-0.635,-3.81) 3(0.635,-3.81) 4(1.905,-3.81) 5(1.905,3.81) 6(0.635,3.81) 7(-0.635,3.81) 8(-1.905,3.81)
  silkscreen extent -3.27,-2.93 3.27,2.93, body extent -3.12,-4.22 3.13,4.22, height 2.7
434153017835 [mm] "Tact Switch, SMD, body 3.5x2.9mm"
  rect 1.15x1.05 smd: 1(-1.675,0.725) 2(-1.675,-0.725) 3(1.675,0.725) 4(1.675,-0.725)
  silkscreen extent -0.8,-1.45 0.8,1.45, body extent -2.15,-1.45 2.15,1.45, height 1.7
629722050114 [mm]
  rect 0.3x0.85 smd: A1(-2.75,0.83) A4(-1.25,0.83) A5(-0.75,0.83) A6(-0.25,0.83) A7(0.25,0.83) A8(0.75,0.83) A9(1.25,0.83) A12(2.75,0.83) B1(2.75,-0.83) B4(1.25,-0.83) B5(0.75,-0.83) B6(0.25,-0.83) B7(-0.25,-0.83) B8(-0.75,-0.83) B9(-1.25,-0.83) B12(-2.75,-0.83)
  round 0.56 hole 0.66 unplated: MH1(-3.75,0)
  oval 0.9x0.48 hole 0.58 slot 1 at 0 deg unplated: MH2(3.75,0)
  round 1.2 hole 0.7: Shell(-2.4,2.15) Shell(-2.4,-2.15) Shell(2.4,2.15) Shell(2.4,-2.15)
  silkscreen extent -4.47,-2.3 4.47,2.3, body extent -5.15,-2.3 5.15,2.3, height 9.75
HEATSINK_10MM_10MM_7MM [mm]
  body extent -5,-5 5,5, height 8.2
HEATSINK_70MM_21MM_4MM [mm]
  body extent -35,-10.5 35,10.5, height 1.2
SO-16 [mm]
  rect 1.2x0.8 smd: 1(-3.15,4.445) 2(-3.15,3.175) 3(-3.15,1.905) 4(-3.15,0.635) 5(-3.15,-0.635) 6(-3.15,-1.905) 7(-3.15,-3.175) 8(-3.15,-4.445) 9(3.15,-4.445) 10(3.15,-3.175) 11(3.15,-1.905) 12(3.15,-0.635) 13(3.15,0.635) 14(3.15,1.905) 15(3.15,3.175) 16(3.15,4.445)
  silkscreen extent -3.28,-5.15 2.23,5.63, body extent -3.5,-5.15 3.5,5.15, height 2.3
SOT-23-3 [mil]
  rect 20x40 smd mask+3.94: 1(-37.4,-38) 2(37.4,-38) 3(0,32.75)
  silkscreen extent -65,-33 65,33, body extent -57,-47 57,47, height 44
SOT-23-5 [mil]
  rect 50x22 smd mask+1.97: 1(-48,37.5) 2(-48,0) 3(-48,-37.5) 4(48,-37.5) 5(48,37.5)
  silkscreen extent -55,-59 33,71, body extent -55,-57 55,57, height 57
SOT-23-6 [mil]
  rect 40x20 smd paste+0: 1(-49,37.4) 2(-49,0) 3(-49,-37.4) 4(49,-37.4) 5(49,0) 6(49,37.4)
  silkscreen extent -91,-66 41,66, body extent -49,-59 49,59, height 43
TRIM-3P80MM_3P60MM [mm]
  rect 1.2x1.2 smd: 1(-1.8,1) 3(-1.8,-1)
  rect 1.5x1.6 smd: 2(1.45,0)
  silkscreen extent -3.05,-1.8 1.8,1.8, body extent -1.9,-1.5 1.9,1.5, height 1.2
UFQFN-48-7X7_EXPOSED_PAD [mm]
  rrect25% 0.87x0.27 smd mask+0: 1(-3.43,2.75) 2(-3.43,2.25) 3(-3.43,1.75) 4(-3.43,1.25) 5(-3.43,0.75) 6(-3.43,0.25) 7(-3.43,-0.25) 8(-3.43,-0.75) 9(-3.43,-1.25) 10(-3.43,-1.75) 11(-3.43,-2.25) 12(-3.43,-2.75) 25(3.43,-2.75) 26(3.43,-2.25) 27(3.43,-1.75) 28(3.43,-1.25) 29(3.43,-0.75) 30(3.43,-0.25) 31(3.43,0.25) 32(3.43,0.75) 33(3.43,1.25) 34(3.43,1.75) 35(3.43,2.25) 36(3.43,2.75)
  rrect25% 0.27x0.87 smd mask+0: 13(-2.75,-3.43) 14(-2.25,-3.43) 15(-1.75,-3.43) 16(-1.25,-3.43) 17(-0.75,-3.43) 18(-0.25,-3.43) 19(0.25,-3.43) 20(0.75,-3.43) 21(1.25,-3.43) 22(1.75,-3.43) 23(2.25,-3.43) 24(2.75,-3.43) 37(2.75,3.43) 38(2.25,3.43) 39(1.75,3.43) 40(1.25,3.43) 41(0.75,3.43) 42(0.25,3.43) 43(-0.25,3.43) 44(-0.75,3.43) 45(-1.25,3.43) 46(-1.75,3.43) 47(-2.25,3.43) 48(-2.75,3.43)
  rect 5.6x5.6 smd paste-4 mask+0: 49(0,0)
  silkscreen extent -4.18,-3.5 3.5,3.5, body extent -3.5,-3.5 3.5,3.5, height 0.6
WCAP-ASLI_D6.3H7.7 [mm] "Aluminium Electrolytic V-Chip SMT Capacitors, 6.3x7.7mm"
  rect 3.5x1.6 smd: 1(2.8,0) 2(-2.8,0)
  silkscreen extent -3.4,-3.4 3.4,3.4, body extent -3.65,-3.3 3.65,3.3, height 7.7
WCAP-CSGP_0603_L1.6W0.8H0.8_Wave [mm] "Ceramic Capacitors, 0603, body 1.6x0.8mm"
  rect 0.7x0.8 smd: 1(-0.85,0) 2(0.85,0)
  body extent -0.8,-0.4 0.8,0.4, height 0.8
WCAP-CSGP_0805_L2W1.25H1.25 [mm] "Ceramic Capacitors, body 2x1.25mm"
  rect 0.9x1.3 smd: 1(-0.95,0) 2(0.95,0)
  body extent -1,-0.63 1,0.63, height 1.25
WE-MAIA_3015 [mm] "SMD Power Inductor, 2-leads, body 3x3mm"
  rect 1.3x3.4 smd: 1(-1.05,0) 2(1.05,0)
  SIG keep-out region: -0.4,1.7 0.4,1.7 0.4,-1.7 -0.4,-1.7
  body extent -1.5,-1.5 1.5,1.5, height 1.5
WE-XTAL_IQXC-42 [mm] "Quartz Crystal, size IQXC-42, body 2x1.6mm"
  rect 0.88x0.78 smd: 1(-0.64,-0.49) 2(0.64,-0.49) 3(0.64,0.49) 4(-0.64,0.49)
  silkscreen extent -1.52,-0.57 -1.38,-0.43, body extent -1,-0.8 1,0.8, height 0.5
WL-SMCW_0603_150060xx75000 [mm] "SMD Mono-color Chip LED, body 1.60 x 0.80 mm"
  rect 0.8x0.8 smd: 1(-0.8,0) 2(0.8,0)
  silkscreen extent -1.55,-0.4 -1.4,0.4, body extent -0.8,-0.4 0.8,0.4, height 0.7
WL-SMCW_0603_150060xx75003 [mm] "SMD Mono-color Chip LED, body 1.6x0.8mm"
  rect 0.8x0.8 smd: 1(-0.8,0) 2(0.8,0)
  silkscreen extent -1.55,-0.4 -1.4,0.4, body extent -0.8,-0.4 0.8,0.4, height 0.7

## Part data
C200: library part 885012207103R, "WCAP-CSGP Multilayer Ceramic Chip Capacitor, General Purpose, size 0805, 1μF, 50V", Capacitance=1uF, Capacitance Tolerance=+/-10%, Case/Size Code=0805, Insulation Resistance=0.1Gohm, Manufacturer="Wurth Elektronik", Operating Temperature Max=125degC, Operating Temperature Min=-55degC, Rated Voltage (DC)=50V, Category="Multilayer Ceramic Chip Capacitors", Ceramic Type=X7R, ComponentLink1Description="Website Link", ComponentLink1URL=https://www.we-online.com/redexpert/article/885012207103R?ad, ComponentLink2Description="Datasheet Link", ComponentLink2URL=https://www.we-online.com/redexpert/spec/885012207103R?ad, Dissipation Factor=10%, Height=1.25mm, Length=2mm, Manufacturer Part Number=885012207103R, Match Code=WCAP-CSGP, Mount="Surface Mount", Packaging="Tape and Reel", Technical Reference=X7R0805105K050DFCT20000, Width=1.25mm
C201 C209 C210 C211 C216: library part 885012106029, "WCAP-CSGP Multilayer Ceramic Chip Capacitor, General Purpose, size 0603, 2.2μF, 16V", Capacitance=2.2uF, Capacitance Tolerance=+/-10%, Case/Size Code=0603, Insulation Resistance=0.05Gohm, Manufacturer="Wurth Elektronik", Operating Temperature Max=85degC, Operating Temperature Min=-55degC, Rated Voltage (DC)=16V, Category="Multilayer Ceramic Chip Capacitors", Ceramic Type=X5R, ComponentLink1Description="Website Link", ComponentLink1URL=https://www.we-online.com/redexpert/article/885012106029?ad, ComponentLink2Description="Datasheet Link", ComponentLink2URL=https://www.we-online.com/redexpert/spec/885012106029?ad, Dissipation Factor=10%, Height=0.8mm, Length=1.6mm, Manufacturer Part Number=885012106029, Match Code=WCAP-CSGP, Mount="Surface Mount", Packaging="Tape and Reel", Technical Reference=X5R0603225K016DFCT10000, Width=0.8mm
C202 C222 C224 C232 C234 C242 C244: library part 885012206049, "WCAP-CSGP Multilayer Ceramic Chip Capacitor, General Purpose, size 0603, 330nF, 16V", Capacitance=330nF, Capacitance Tolerance=+/-10%, Case/Size Code=0603, Insulation Resistance=1.5Gohm, Manufacturer="Wurth Elektronik", Operating Temperature Max=125degC, Operating Temperature Min=-55degC, Rated Voltage (DC)=16V, Category="Multilayer Ceramic Chip Capacitors", Ceramic Type=X7R, ComponentLink1Description="Website Link", ComponentLink1URL=https://www.we-online.com/redexpert/article/885012206049?ad, ComponentLink2Description="Datasheet Link", ComponentLink2URL=https://www.we-online.com/redexpert/spec/885012206049?ad, Dissipation Factor=5%, Height=0.8mm, Length=1.6mm, Manufacturer Part Number=885012206049, Match Code=WCAP-CSGP, Mount="Surface Mount", Packaging="Tape and Reel", Technical Reference=X7R0603334K016DFCT10000, Width=0.8mm
C203 C204 C208 C212 C213 C214 C215: library part 885012206046, "WCAP-CSGP Multilayer Ceramic Chip Capacitor, General Purpose, size 0603, 100nF, 16V", Capacitance=100nF, Capacitance Tolerance=+/-10%, Case/Size Code=0603, Insulation Resistance=5Gohm, Manufacturer="Wurth Elektronik", Operating Temperature Max=125degC, Operating Temperature Min=-55degC, Rated Voltage (DC)=16V, Category="Multilayer Ceramic Chip Capacitors", Ceramic Type=X7R, ComponentLink1Description="Website Link", ComponentLink1URL=https://www.we-online.com/redexpert/article/885012206046?ad, ComponentLink2Description="Datasheet Link", ComponentLink2URL=https://www.we-online.com/redexpert/spec/885012206046?ad, Dissipation Factor=3.5%, Height=0.8mm, Length=1.6mm, Manufacturer Part Number=885012206046, Match Code=WCAP-CSGP, Mount="Surface Mount", Packaging="Tape and Reel", Technical Reference=X7R0603104K016DFCT10000, Width=0.8mm
C205: library part 885012207102, "WCAP-CSGP Multilayer Ceramic Chip Capacitor, General Purpose, size 0805, 470nF, 50V", Capacitance=470nF, Capacitance Tolerance=+/-10%, Case/Size Code=0805, Insulation Resistance=1.1Gohm, Manufacturer="Wurth Elektronik", Operating Temperature Max=125degC, Operating Temperature Min=-55degC, Rated Voltage (DC)=50V, Category="Multilayer Ceramic Chip Capacitors", Ceramic Type=X7R, ComponentLink1Description="Website Link", ComponentLink1URL=https://www.we-online.com/redexpert/article/885012207102?ad, ComponentLink2Description="Datasheet Link", ComponentLink2URL=https://www.we-online.com/redexpert/spec/885012207102?ad, Dissipation Factor=3%, Height=1.25mm, Length=2mm, Manufacturer Part Number=885012207102, Match Code=WCAP-CSGP, Mount="Surface Mount", Packaging="Tape and Reel", Technical Reference=X7R0805474K050DFCT10000, Width=1.25mm
C206 C207: library part 885012006017, "WCAP-CSGP Multilayer Ceramic Chip Capacitor, General Purpose, size 0603, 10pF, 16V", Capacitance=10pF, Capacitance Tolerance=+/-5%, Case/Size Code=0603, Insulation Resistance=10Gohm, Manufacturer="Wurth Elektronik", Operating Temperature Max=125degC, Operating Temperature Min=-55degC, Rated Voltage (DC)=16V, Category="Multilayer Ceramic Chip Capacitors", Ceramic Type=NP0, ComponentLink1Description="Website Link", ComponentLink1URL=https://www.we-online.com/redexpert/article/885012006017?ad, ComponentLink2Description="Datasheet Link", ComponentLink2URL=https://www.we-online.com/redexpert/spec/885012006017?ad, Height=0.8mm, Length=1.6mm, Manufacturer Part Number=885012006017, Match Code=WCAP-CSGP, Mount="Surface Mount", Packaging="Tape and Reel", Q Factor=600, Technical Reference=NP00603100J016DFCT10000, Width=0.8mm
C217 C218: library part 885012206052, "WCAP-CSGP Multilayer Ceramic Chip Capacitor, General Purpose, size 0603, 1μF, 16V", Capacitance=1uF, Capacitance Tolerance=+/-10%, Case/Size Code=0603, Insulation Resistance=0.1Gohm, Manufacturer="Wurth Elektronik", Operating Temperature Max=125degC, Operating Temperature Min=-55degC, Rated Voltage (DC)=16V, Category="Multilayer Ceramic Chip Capacitors", Ceramic Type=X7R, ComponentLink1Description="Website Link", ComponentLink1URL=https://www.we-online.com/redexpert/article/885012206052?ad, ComponentLink2Description="Datasheet Link", ComponentLink2URL=https://www.we-online.com/redexpert/spec/885012206052?ad, Dissipation Factor=10%, Height=0.8mm, Length=1.6mm, Manufacturer Part Number=885012206052, Match Code=WCAP-CSGP, Mount="Surface Mount", Packaging="Tape and Reel", Technical Reference=X7R0603105K016DFCT10000, Width=0.8mm
C219 C220 C229 C230 C239 C240: library part 865080645012, "WCAP-ASLI Aluminum Electrolytic Capacitor, V-Chip, SMT, 6.3mm x 7.7mm, 47μF, 50V", Capacitance=47uF, Leakage Current=23.5uA, Manufacturer="Wurth Elektronik", Operating Temperature Max=105degC, Operating Temperature Min=-55degC, Rated Voltage (DC)=50V, Ripple Current=230mA, Category="Aluminum Electrolytic Capacitors", ComponentLink1Description="Website Link", ComponentLink1URL=https://www.we-online.com/redexpert/article/865080645012?ad, ComponentLink2Description="Datasheet Link", ComponentLink2URL=https://www.we-online.com/redexpert/spec/865080645012?ad, Diameter=6.3mm, Dissipation Factor=12%, Endurance=2000h, Height=7.7mm, Impedance=700mohm, Manufacturer Part Number=865080645012, Match Code=WCAP-ASLI, Mount="Surface Mount", Packaging="Tape and Reel"
C221 C223 C231 C233 C241 C243: library part 885012206121, "WCAP-CSGP Multilayer Ceramic Chip Capacitor, General Purpose, size 0603, 330nF, 50V", Capacitance=330nF, Capacitance Tolerance=+/-10%, Case/Size Code=0603, Insulation Resistance=1.5GΩ, Manufacturer="Wurth Elektronik", Max Operating Temperature=125°C, Min Operating Temperature=-55°C, Rated Voltage (DC)=50V, Category="Multilayer Ceramic Chip Capacitors", Ceramic Type=X7R, ComponentLink1Description="Website Link", ComponentLink1URL=https://www.we-online.com/redexpert/article/885012206121?ad, ComponentLink2Description="Datasheet Link", ComponentLink2URL=https://www.we-online.com/redexpert/spec/885012206121?ad, Dissipation Factor=10%, Height=0.8mm, Length=1.6mm, Manufacturer Part Number=885012206121, Match Code=WCAP-CSGP, Mount="Surface Mount", Packaging="Tape and Reel", Technical Reference=X7R0603334K050DFCT10000, Width=0.8mm
C225 C226 C237 C238 C247 C248: library part 885012206040, "WCAP-CSGP Multilayer Ceramic Chip Capacitor, General Purpose, size 0603, 10nF, 16V", Capacitance=10nF, Capacitance Tolerance=+/-10%, Case/Size Code=0603, Insulation Resistance=10Gohm, Manufacturer="Wurth Elektronik", Operating Temperature Max=125degC, Operating Temperature Min=-55degC, Rated Voltage (DC)=16V, Category="Multilayer Ceramic Chip Capacitors", Ceramic Type=X7R, ComponentLink1Description="Website Link", ComponentLink1URL=https://www.we-online.com/redexpert/article/885012206040?ad, ComponentLink2Description="Datasheet Link", ComponentLink2URL=https://www.we-online.com/redexpert/spec/885012206040?ad, Dissipation Factor=3.5%, Height=0.8mm, Length=1.6mm, Manufacturer Part Number=885012206040, Match Code=WCAP-CSGP, Mount="Surface Mount", Packaging="Tape and Reel", Technical Reference=X7R0603103K016DFCT10000, Width=0.8mm
C227 C228 C235 C236 C245 C246: library part 885012206034, "WCAP-CSGP Multilayer Ceramic Chip Capacitor, General Purpose, size 0603, 1nF, 16V", Capacitance=1nF, Capacitance Tolerance=+/-10%, Case/Size Code=0603, Insulation Resistance=10Gohm, Manufacturer="Wurth Elektronik", Operating Temperature Max=125degC, Operating Temperature Min=-55degC, Rated Voltage (DC)=16V, Category="Multilayer Ceramic Chip Capacitors", Ceramic Type=X7R, ComponentLink1Description="Website Link", ComponentLink1URL=https://www.we-online.com/redexpert/article/885012206034?ad, ComponentLink2Description="Datasheet Link", ComponentLink2URL=https://www.we-online.com/redexpert/spec/885012206034?ad, Dissipation Factor=3.5%, Height=0.8mm, Length=1.6mm, Manufacturer Part Number=885012206034, Match Code=WCAP-CSGP, Mount="Surface Mount", Packaging="Tape and Reel", Technical Reference=X7R0603102K016DFCT10000, Width=0.8mm
D200: library part 150060VS75000, "WL-SMCW Mono-color Chip LED Waterclear, SMT, size 0603, Bright Green, 2V, 140°", Case/Size Code=0603, Emitting Color="Bright Green", Forward Voltage=2V, Manufacturer="Wurth Elektronik", Operating Temperature Max=85degC, Operating Temperature Min=-40degC, Category="Signal LEDs", Chip Technology=AlInGaP, ComponentLink1Description="Website Link", ComponentLink1URL=https://www.we-online.com/redexpert/article/150060VS75000?ad, ComponentLink2Description="Datasheet Link", ComponentLink2URL=https://www.we-online.com/redexpert/spec/150060VS75000?ad, Dominant Wavelength=570nm, Height=0.7mm, Length=1.6mm, Luminous Intensity=40mcd, Manufacturer Part Number=150060VS75000, Match Code=WL-SMCW, Mount="Surface Mount", Packaging="Tape and Reel", Peak Wavelength=572nm, Viewing Angle=140deg, Width=0.8mm
D201: "TVS DIODE 5.25VWM 17VC SOT23-6", Breakdown Voltage=6V, Case/Package=SOT-23-6, Clamping Voltage=17V, Forward Voltage=860mV, Leakage Current=150nA, Manufacturer=STMicroelectronics, Max Junction Temperature (Tj)=150°C, Min Operating Temperature=-40°C, Operating Supply Voltage=1.1V, Peak Pulse Current=5A, Power Line Protection=Yes, Reverse Standoff Voltage=5.25V, Supplier Part Number=497-11882-1-ND, Test Current=1mA, Category="TVS Diodes", China RoHS=Compliant, ComponentLink1Description=https://datasheet.octopart.com:443/USBLC6-2SC6Y-STMicroelectronics-datasheet-12533815.pdf?src-supplier=ODG+(Origin+Data+Global), ComponentLink1URL=https://datasheet.octopart.com:443/USBLC6-2SC6Y-STMicroelectronics-datasheet-12533815.pdf?src-supplier=ODG+(Origin+Data+Global), ComponentLink2Description=https://datasheet.octopart.com:443/USBLC6-2SC6Y-STMicroelectronics-datasheet-13733956.pdf?src-supplier=STMicroelectronics, ComponentLink2URL=https://datasheet.octopart.com:443/USBLC6-2SC6Y-STMicroelectronics-datasheet-13733956.pdf?src-supplier=STMicroelectronics, ComponentLink3Description=https://datasheet.octopart.com:443/USBLC6-2SC6Y-STMicroelectronics-datasheet-10412581.pdf?src-supplier=Factory+Futures, ComponentLink3URL=https://datasheet.octopart.com:443/USBLC6-2SC6Y-STMicroelectronics-datasheet-10412581.pdf?src-supplier=Factory+Futures, ComponentLink4Description=https://datasheet.octopart.com:443/USBLC6-2SC6Y-STMicroelectronics-datasheet-525477.pdf?src-supplier=Factory+Futures, ComponentLink4URL=https://datasheet.octopart.com:443/USBLC6-2SC6Y-STMicroelectronics-datasheet-525477.pdf?src-supplier=Factory+Futures, Depth=1.75mm, Direction=Unidirectional, Element Configuration=Dual, ESD Protection=Yes, ESR=330Ω, Height=1.45mm, Lead Free="Lead Free", Length=3mm, Lifecycle Status=Production, Manufacturer Part Number=USBLC6-2SC6Y, Max Operating Temperature=150°C, Max Reverse Leakage Current=150nA, Min Breakdown Voltage=6V, Mounting Technology="Surface Mount", Number of Bidirectional Channels=2, Number of Channels=2, Number of Elements=1, Number of Terminals=6, Packaging="Tape and Reel", Peak Reverse Current=150nA, Pins=6, Polarity=Unidirectional, Pricing="1=0.46, 10=0.298, 100=0.211, 500=0.164, 1000=0.144 (USD)", Radiation Hardening=No, REACH SVHC=Yes, RoHS=Compliant, Schedule B="8536300000, 8536300000|8536300000|8536300000|8536300000|8536300000", Stock=64605, Supplier=DigiKey, Termination=SMD/SMT, Width=1.75mm
D202 D203 D204 D205 D206 D207: library part 150060RS75003, "WL-SMCW Mono-color Chip LED Waterclear, SMT, size 0603, Red, 2V, 140°", Case/Size Code=0603, Emitting Color=Red, Forward Voltage=2V, Manufacturer="Wurth Elektronik", Operating Temperature Max=100degC, Operating Temperature Min=-40degC, Category="Signal LEDs", Chip Technology=AlInGaP, ComponentLink1Description="Website Link", ComponentLink1URL=https://www.we-online.com/redexpert/article/150060RS75003?ad, ComponentLink2Description="Datasheet Link", ComponentLink2URL=https://www.we-online.com/redexpert/spec/150060RS75003?ad, Dominant Wavelength=625nm, Height=0.7mm, Length=1.6mm, Luminous Intensity=530mcd, Manufacturer Part Number=150060RS75003, Match Code=WL-SMCW, Mount="Surface Mount", Packaging="Tape and Reel", Peak Wavelength=630nm, Viewing Angle=140deg, Width=0.8mm
HS200 HS201 HS202 HS203 HS204 HS205: library part GENERIC-HEATSINK-10X10X7MM, "GENERIC HEATSINK 10X10X7MM", Manufacturer=OEM, Manufacturer Part Number=None
HS206: library part GENERIC-HEATSINK-70X21X4MM, "GENERIC HEATSINK 70X21X4MM", Manufacturer=OEM, Manufacturer Part Number=None
J200: "WR-COM USB 2.0 Vertical SMT", Manufacturer="Wurth Elektronik", Operating Temperature Max=85degC, Operating Temperature Min=-40degC, Rated Current=5, Working Voltage="48V (DC)", Application="USB 2.0", Category="Input/Output Connector", ComponentLink1Description="Website Link", ComponentLink1URL=https://www.we-online.com, ComponentLink2Description="Datasheet Link", ComponentLink2URL=https://www.we-online.com/components/products/datasheet/629722050114, Gender=Receptacle, Interface Type="Type C", Manufacturer Part Number=629722050114, Match Code=WR-USB, Mount="Surface Mount", Number of Pins=16, Number of Ports=1, Orientation=Vertical, Packaging="Tape and Reel"
L200: library part 78438335470, "WE-MAIA SMT Power Inductor, size 3015, 47uH, 0.5A, 2300mohm", Case/Size Code=3015, DC Resistance Max=2300mohm, Manufacturer="Wurth Elektronik", Operating Temperature Max=125degC, Operating Temperature Min=-40degC, Rated Current=0.5A, Saturation Current @ 10%=0.75A, Saturation Current @ 30%=1.5A, Self Resonant Frequency=8MHz, Automotive=Yes, Category="Power Inductors", ComponentLink1Description="Website Link", ComponentLink1URL=https://www.we-online.com/redexpert/article/78438335470?ad, ComponentLink2Description="Datasheet Link", ComponentLink2URL=https://www.we-online.com/redexpert/spec/78438335470?ad, Height=1.5mm, Inductance=47uH, Length=3mm, Manufacturer Part Number=78438335470, Match Code=WE-MAIA, Mount="Surface Mount", Packaging="Tape and Reel", Width=3mm
P200 P201: "WR-PHD Pin Header, THT, Angled, pitch 2.54mm, 1 Row, 4P", Contact Resistance=20mOhm, Manufacturer="Wurth Elektronik", Operating Temperature Max=105degC, Operating Temperature Min=-40degC, Rated Current=3A, Withstanding Voltage=500V, Working Voltage=250V, Category="Board-to-Board Connectors", ComponentLink1Description="Website Link", ComponentLink1URL=https://www.we-online.com/redexpert/article/61300411021?ad, ComponentLink2Description="Datasheet Link", ComponentLink2URL=https://www.we-online.com/redexpert/spec/61300411021?ad, Gender="Pin Header", Lead Pitch=2.54mm, Manufacturer Part Number=61300411021, Match Code=WR-PHD, Mount="Through Hole", Number of Pins=4, Number of Rows=1, Orientation=Angled, Packaging=Bag
P202 P205 P206 P207 P208: "WR-WTB “J” Type THT Male Horizontal Shrouded Header, pitch 2.5 mm, 2 pins", Contact Resistance="20 mohm", Manufacturer="Wurth Elektronik", Operating Temperature Max=85degC, Operating Temperature Min=-25degC, Rated Current="3 A", Withstanding Voltage="800 V(AC)", Working Voltage="250 V(AC)", Category="Wire-to-Board Connector", ComponentLink1Description="Website Link", ComponentLink1URL=https://www.we-online.com/redexpert/article/68800211722?ad, ComponentLink2Description="Datasheet Link", ComponentLink2URL=https://www.we-online.com/redexpert/spec/68800211722?ad, Gender=Male, Height="4.2 mm", Lead Pitch="2.5 mm", Length="7.5 mm", Manufacturer Part Number=68800211722, Match Code=WR-WTB, Mount="Through Hole", Number of Pins=2, Number of Rows=1, Orientation=Horizontal, Packaging=Bag, Width="8.3 mm"
P203 P204: "WR-WTB “J” Type THT Male Horizontal Shrouded Header, pitch 2.5 mm, 6 pins", Contact Resistance="20 mohm", Manufacturer="Wurth Elektronik", Operating Temperature Max=85degC, Operating Temperature Min=-25degC, Rated Current="3 A", Withstanding Voltage="800 V(AC)", Working Voltage="250 V(AC)", Category="Wire-to-Board Connector", ComponentLink1Description="Website Link", ComponentLink1URL=https://www.we-online.com/redexpert/article/68800611722?ad, ComponentLink2Description="Datasheet Link", ComponentLink2URL=https://www.we-online.com/redexpert/spec/68800611722?ad, Gender=Male, Height="4.2 mm", Lead Pitch="2.5 mm", Length="17.5 mm", Manufacturer Part Number=68800611722, Match Code=WR-WTB, Mount="Through Hole", Number of Pins=6, Number of Rows=1, Orientation=Horizontal, Packaging=Bag, Width="8.3 mm"
P209: "WR-WTB “J” Type THT Male Horizontal Shrouded Header, pitch 2.5 mm, 10 pins", Contact Resistance="20 mohm", Manufacturer="Wurth Elektronik", Operating Temperature Max=85degC, Operating Temperature Min=-25degC, Rated Current="3 A", Withstanding Voltage="800 V(AC)", Working Voltage="250 V(AC)", Category="Wire-to-Board Connector", ComponentLink1Description="Website Link", ComponentLink1URL=https://www.we-online.com/redexpert/article/68801011722?ad, ComponentLink2Description="Datasheet Link", ComponentLink2URL=https://www.we-online.com/redexpert/spec/68801011722?ad, Gender=Male, Height="4.2 mm", Lead Pitch="2.5 mm", Length="27.5 mm", Manufacturer Part Number=68801011722, Match Code=WR-WTB, Mount="Through Hole", Number of Pins=10, Number of Rows=1, Orientation=Horizontal, Packaging=Bag, Width="8.3 mm"
P210 P211 P212 P213: "WR-WTB “J” Type THT Male Horizontal Shrouded Header, pitch 2.5 mm, 4 pins", Contact Resistance="20 mohm", Manufacturer="Wurth Elektronik", Operating Temperature Max=85degC, Operating Temperature Min=-25degC, Rated Current="3 A", Withstanding Voltage="800 V(AC)", Working Voltage="250 V(AC)", Category="Wire-to-Board Connector", ComponentLink1Description="Website Link", ComponentLink1URL=https://www.we-online.com/redexpert/article/68800411722?ad, ComponentLink2Description="Datasheet Link", ComponentLink2URL=https://www.we-online.com/redexpert/spec/68800411722?ad, Gender=Male, Height="4.2 mm", Lead Pitch="2.5 mm", Length="12.5 mm", Manufacturer Part Number=68800411722, Match Code=WR-WTB, Mount="Through Hole", Number of Pins=4, Number of Rows=1, Orientation=Horizontal, Packaging=Bag, Width="8.3 mm"
Q200 Q201 Q202 Q203 Q204: "TRANS NPN 45V 0.5A SOT23-3", Case/Package=SOT-23-3, Clock Frequency=100MHz, Collector Base Voltage (VCBO)=50V, Collector Emitter Breakdown Voltage=45V, Continuous Collector Current=500mA, Emitter Base Voltage (VEBO)=5V, Manufacturer=onsemi, Manufacturer Lifecycle Status=ACTIVE, Max Operating Temperature=150°C, Max Power Dissipation=300mW, Min Operating Temperature=-55°C, Supplier Part Number=SBC817-40LT3GOSCT-ND, Category=BJTs, China RoHS=Compliant, Collector Emitter Voltage (VCEO)=45V, ComponentLink1Description=https://datasheet.octopart.com:443/SBC817-40LT3G-onsemi-datasheet-175914671.pdf?src-supplier=IHS, ComponentLink1URL=https://datasheet.octopart.com:443/SBC817-40LT3G-onsemi-datasheet-175914671.pdf?src-supplier=IHS, ComponentLink2Description=https://datasheet.octopart.com:443/SBC817-40LT3G-ON-Semiconductor-datasheet-11547464.pdf?src-supplier=Upverter, ComponentLink2URL=https://datasheet.octopart.com:443/SBC817-40LT3G-ON-Semiconductor-datasheet-11547464.pdf?src-supplier=Upverter, ComponentLink3Description=https://datasheet.octopart.com:443/SBC817-40LT3G-ON-Semiconductor-datasheet-78758879.pdf?src-supplier=Master+Electronics, ComponentLink3URL=https://datasheet.octopart.com:443/SBC817-40LT3G-ON-Semiconductor-datasheet-78758879.pdf?src-supplier=Master+Electronics, ComponentLink4Description=https://datasheet.octopart.com:443/SBC817-40LT3G-onsemi-datasheet-189132499.pdf?src-supplier=Master+Electronics, ComponentLink4URL=https://datasheet.octopart.com:443/SBC817-40LT3G-onsemi-datasheet-189132499.pdf?src-supplier=Master+Electronics, ComponentLink5Description=https://datasheet.octopart.com:443/SBC817-40LT3G-ON-Semiconductor-datasheet-8110464.pdf?src-supplier=onsemi, ComponentLink5URL=https://datasheet.octopart.com:443/SBC817-40LT3G-ON-Semiconductor-datasheet-8110464.pdf?src-supplier=onsemi, ComponentLink6Description=https://datasheet.octopart.com:443/SBC817-40LT3G-ON-Semiconductor-datasheet-6400296.pdf?src-supplier=onsemi, ComponentLink6URL=https://datasheet.octopart.com:443/SBC817-40LT3G-ON-Semiconductor-datasheet-6400296.pdf?src-supplier=onsemi, ComponentLink7Description=https://datasheet.octopart.com:443/SBC817-40LT3G-onsemi-datasheet-133521192.pdf?src-supplier=TME, ComponentLink7URL=https://datasheet.octopart.com:443/SBC817-40LT3G-onsemi-datasheet-133521192.pdf?src-supplier=TME, ComponentLink8Description=http://sigma.octopart.com:80/15540786/rohs_certificate/ON-Semiconductor-SBC817-40LT3G.pdf?src-supplier=Compliance+Statements, ComponentLink8URL=http://sigma.octopart.com:80/15540786/rohs_certificate/ON-Semiconductor-SBC817-40LT3G.pdf?src-supplier=Compliance+Statements, ComponentLink9Description=http://sigma.octopart.com:80/15684525/materials_sheet/ON-Semiconductor-SBC817-40LT3G.csv?src-supplier=Compliance+Statements, ComponentLink9URL=http://sigma.octopart.com:80/15684525/materials_sheet/ON-Semiconductor-SBC817-40LT3G.csv?src-supplier=Compliance+Statements, ComponentLink10Description=http://sigma.octopart.com:80/150631289/rohs_statement/ON-Semiconductor-SBC817-40LT3G.pdf?src-supplier=Compliance+Statements, ComponentLink10URL=http://sigma.octopart.com:80/150631289/rohs_statement/ON-Semiconductor-SBC817-40LT3G.pdf?src-supplier=Compliance+Statements, ComponentLink11Description=http://sigma.octopart.com:80/reach_statement/ON-Semiconductor-company-79.pdf?src-supplier=Compliance+Statements, ComponentLink11URL=http://sigma.octopart.com:80/reach_statement/ON-Semiconductor-company-79.pdf?src-supplier=Compliance+Statements, ComponentLink12Description=https://octopart.com:443/opatz8j6/c1?t=cEC30QwZsyb0x-FMX1jhecc8cj0lODbyQVaJL5I4EOudI-i4uiyo8QJe7x8WGpb_UfldyhXdI6wTsOpeJ5HWz7Kzleo1EiYpUhSwBawIenFlUCJsMQESd9nlIcVrbvWrabnb6HpXCtvxDkswRDKZDOG3MBWymJDy-mDPZ7u5UlptsX8-ONvWANeBowi-w7nz9iZWLyjqVoM_QTKEQgTILpDidA8CXVyMync_ukwLaadxciX7hbgDafM4N20bPQPEg7z2Sm1KwG15cEibpJqtQ1hKuQpn-edZc_o2ddvdnsTvT3gddPA_45tVxaNa9XWOJj00WFdTbgFSlU6TTFEybWVRRlK52823bHwN5uVZ-7M&src-supplier=Compliance+Statements, ComponentLink12URL=https://octopart.com:443/opatz8j6/c1?t=cEC30QwZsyb0x-FMX1jhecc8cj0lODbyQVaJL5I4EOudI-i4uiyo8QJe7x8WGpb_UfldyhXdI6wTsOpeJ5HWz7Kzleo1EiYpUhSwBawIenFlUCJsMQESd9nlIcVrbvWrabnb6HpXCtvxDkswRDKZDOG3MBWymJDy-mDPZ7u5UlptsX8-ONvWANeBowi-w7nz9iZWLyjqVoM_QTKEQgTILpDidA8CXVyMync_ukwLaadxciX7hbgDafM4N20bPQPEg7z2Sm1KwG15cEibpJqtQ1hKuQpn-edZc_o2ddvdnsTvT3gddPA_45tVxaNa9XWOJj00WFdTbgFSlU6TTFEybWVRRlK52823bHwN5uVZ-7M&src-supplier=Compliance+Statements, ComponentLink13Description=https://octopart.com:443/opatz8j6/c1?t=zgMoQUE-FAGizIL2uNADbP3CQfJXduVKNLOt0cT-C7XNOnl5EOgq1b4UVzb0SZjomH3a3CKF513mPEsnVuWFTldNModuoiOAROM-U7UMjU1TiA4JeYDoVNfia-psQDQPr2NtqLaOU9Ju06PrsXVFYjz3NjgsSVJa-5X9CcWQ1HPxPGGUjhKccWy9QJVPTcefUdorkFOZvdb3XFmpP_42jgzyR9ZUQAURqjwANTg96Z5ittV_NTML0IEyFPhh0jLh0am3ICJpb8VA9ph6AsqLc9j4fhdilqUiQTpG4UGLijUcgX0mpfEUR-9G0JRIiKjoFhJPWB3BEKd5JcwsK41biiNJ-0hjTcgtgsqlWYFFTPLS&src-supplier=Compliance+Statements, ComponentLink13URL=https://octopart.com:443/opatz8j6/c1?t=zgMoQUE-FAGizIL2uNADbP3CQfJXduVKNLOt0cT-C7XNOnl5EOgq1b4UVzb0SZjomH3a3CKF513mPEsnVuWFTldNModuoiOAROM-U7UMjU1TiA4JeYDoVNfia-psQDQPr2NtqLaOU9Ju06PrsXVFYjz3NjgsSVJa-5X9CcWQ1HPxPGGUjhKccWy9QJVPTcefUdorkFOZvdb3XFmpP_42jgzyR9ZUQAURqjwANTg96Z5ittV_NTML0IEyFPhh0jLh0am3ICJpb8VA9ph6AsqLc9j4fhdilqUiQTpG4UGLijUcgX0mpfEUR-9G0JRIiKjoFhJPWB3BEKd5JcwsK41biiNJ-0hjTcgtgsqlWYFFTPLS&src-supplier=Compliance+Statements, Country of Origin="Mainland China", Element Configuration=Single, Export Control Classification Number (ECCN) Code=EAR99, Frequency=100MHz, Halogen Free="Halogen Free", hFE Min=250, Introduction Date=1991-03-01, Lead Free="Lead Free", Lifecycle Status=Production, Manufacturer Part Number=SBC817-40LT3G, Max Breakdown Voltage=45V, Max Collector Current=500mA, Number of Elements=1, Number of Terminals=3, Packaging="Tape and Reel", Pins=3, Polarity=NPN, Power Dissipation=300mW, Pricing="1=0.24, 10=0.146, 100=0.0904, 500=0.06616, 1000=0.05829, 2000=0.05165, 5000=0.04443 (USD)", Radiation Hardening=No, REACH SVHC=Yes, RoHS=Compliant, Schedule B="8541210080, 8541210080|8541210080, 8541210080|8541210080|8541210080, 8541210080|8541210080|8541210080|8541210080", Stock=144045, Supplier=DigiKey, Transition Frequency=100MHz